# Altium PCB Main_PCB_V1R0_XXXXXX.PcbDoc
Units mm, origin at the board's own origin, x right, y up, seen from the top; angles counter-clockwise.
Board outline 134.2 x 88.35 mm, 2 copper layers (Top Layer, Bottom Layer), stack 1.49 mm thick; 85 components, 40 nets, 202 pads, 24 vias.
Unrouted connection lines stored in the file: 149.
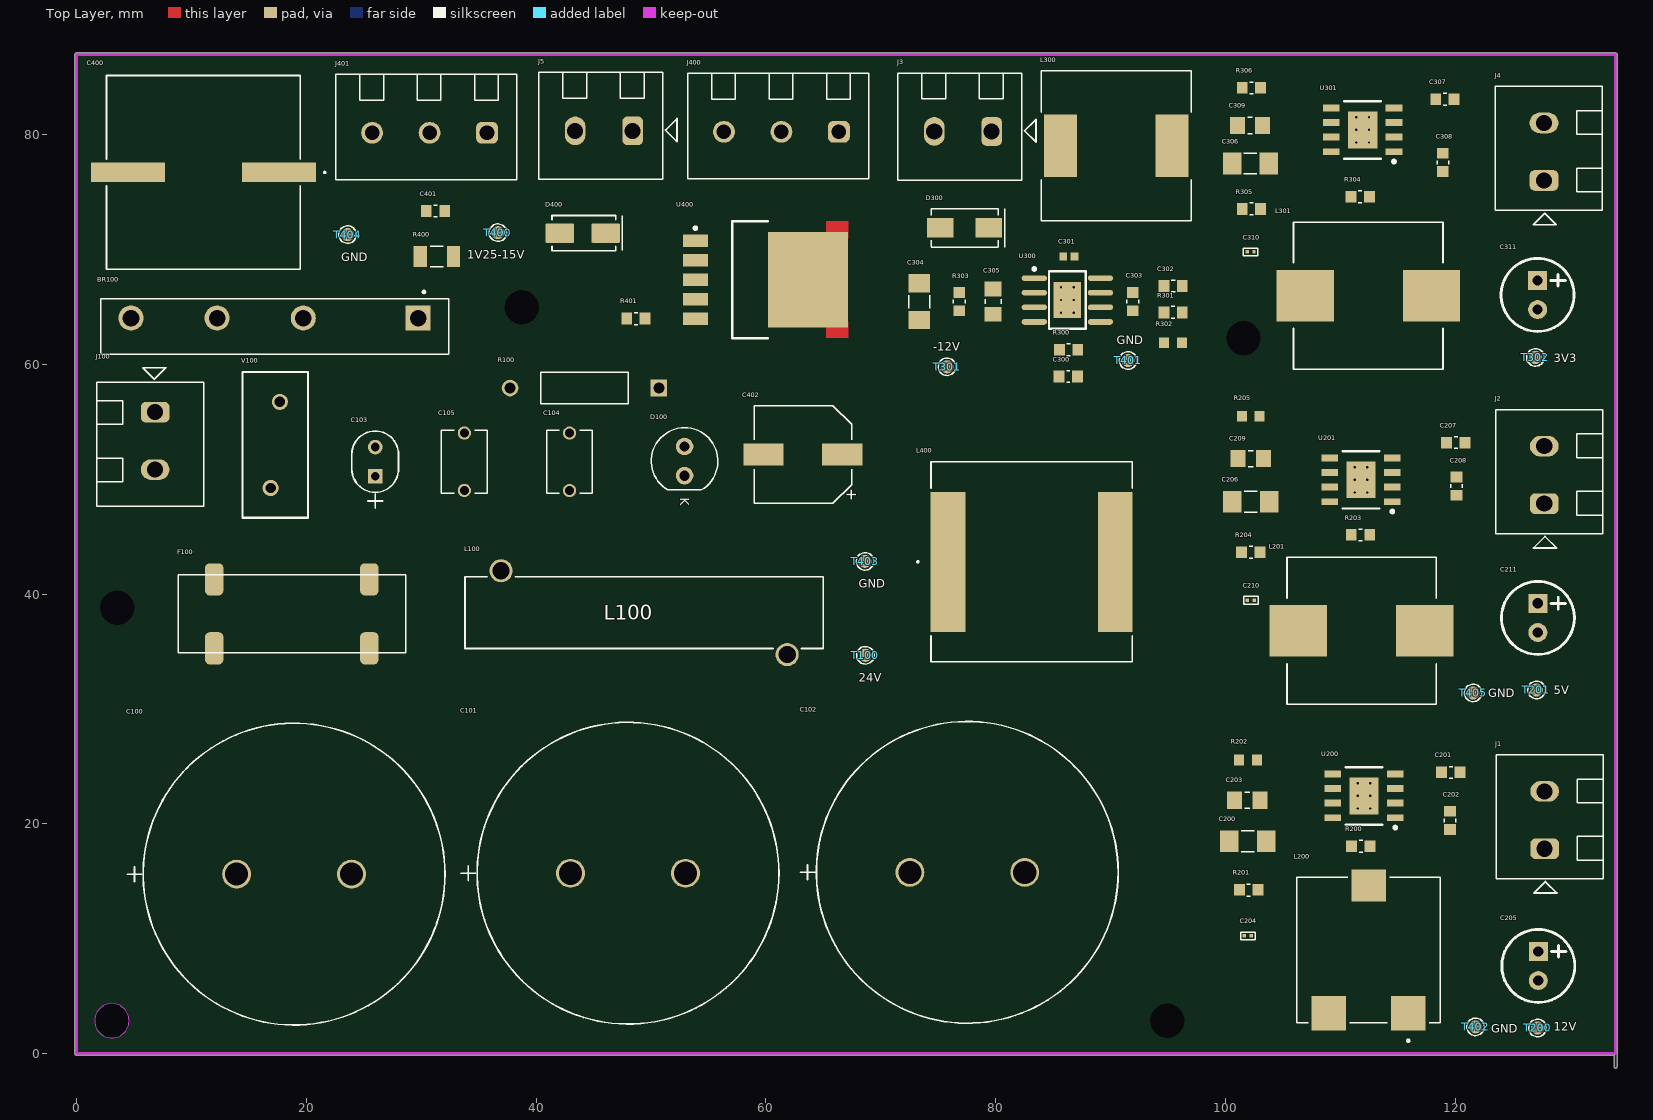
[diagram p0: Top Layer view]
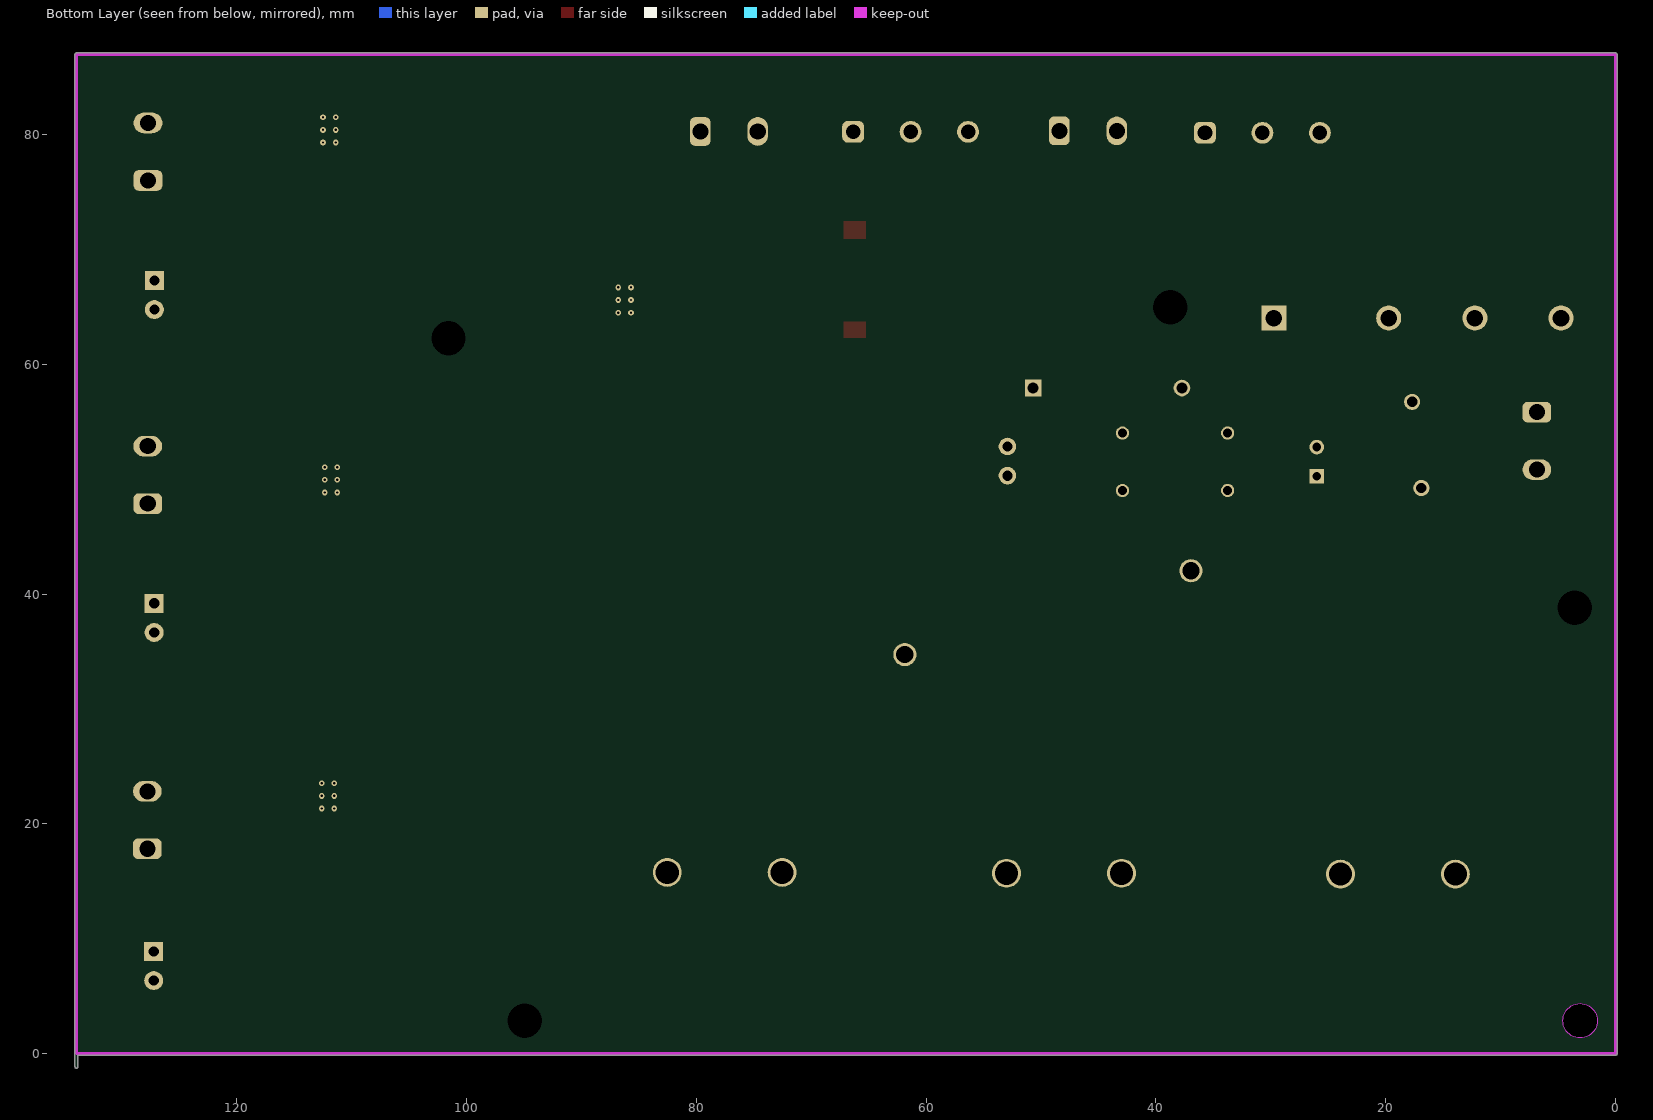
[diagram p1: Bottom Layer view, seen from below]

## Layer stack, top to bottom
Top Solder: solder mask 0.0102, Solder Resist, Dk 3.5
Top Layer: signal copper 0.03
Dielectric 1: dielectric 1.43, FR-4, Dk 4.8
Bottom Layer: signal copper 0.03
Bottom Solder: solder mask 0.0102, Solder Resist, Dk 3.5

## Board outline
-0.127,0 ccw(c0,0) 0,-0.127 133.821,-0.127 133.821,-1.13 ccw(c133.948,-1.13) 134.075,-1.13 134.075,0 134.075,86.965 ccw(c133.948,86.965) 133.948,87.092 0,87.092 ccw(c0,86.965) -0.127,86.965
cut-out: 1.588,2.87 ccw(c3.088,2.87) 3.088,1.37 ccw(c3.088,2.87) 4.588,2.87 ccw(c3.088,2.87) 3.088,4.37 ccw(c3.088,2.87)

## Design rules (kind name [scope] priority, off if disabled: settings)
Clearance [All] p1: gap=0.254 ignorepadtopadclearanceinfootprint=FALSE
PolygonConnect [All] p1: connectstyle=Relief reliefconductorwidth=0.254 reliefentries=4 polygonreliefangle="90 Angle" airgapwidth=0.254
RoutingVias [All] p1: holewidth=0.711 width=1.27 viastyle="Through Hole" minholewidth=0.711 minwidth=1.27 maxholewidth=0.711 maxwidth=1.27
SolderMaskExpansion [All] p1: expansion=0.102 istentingtop=FALSE
SupplyNets "Schematic Supply Nets_3" [InNet('GND')] p1: voltage=0.000
Width [All] p1: maxlimit=0.254 minlimit=0.254 preferedwidth=0.254
30 further rules are at their usual default settings.

## Components (designator, comment, footprint, x,y, rotation, side; value= is the part's Value field where it differs from the comment)
BR100 "25A_50V" BR_25A_50V_GBJ_Bridge 17.245,63.294 r180 top
C100 "6800uF_50V" Cap_6800uF_TH_25*40_50V 13.945,15.628 r0 top value=6800uF
C101 "6800uF_50V" Cap_6800uF_TH_25*40_50V 43.002,15.707 r0 top value=6800uF
C102 "6800uF_50V" Cap_6800uF_TH_25*40_50V 72.528,15.785 r0 top value=6800uF
C103 "100nF_50V" Cap_100nF_X7R-RADIAL_50V 26.001,48.094 r90 top value=100nF
C104 "10uF_50V" Cap_10uF_X7R_RADIAL_50V 42.911,51.512 r90 top value=10uF
C105 "10uF_50V" Cap_10uF_X7R_RADIAL_50V 33.761,51.518 r90 top value=10uF
C200 "10uF 50V" 1206 101.943,18.482 r0 top value=10uF
C201 "0.1uF 50V" 0603 119.612,24.485 r180 top value=0.1uF
C202 "0.1uF 50V" 0603 119.535,20.306 r90 top value=0.1uF
C203 "1uF 25V" 0805 101.896,22.067 r0 top value=1uF
C204 "100pF 25V" 0201 101.941,10.259 r180 top value=100pF
C205 "47uF 25V" RADIAL-CAN_LSx2.54mm_Diax6.35mm 127.222,7.636 r270 top value=47uF
C206 "10uF 50V" 1206 102.201,48.036 r0 top value=10uF
C207 "0.1uF 50V" 0603 120.044,53.18 r0 top value=0.1uF
C208 "0.1uF 50V" 0603 120.101,49.395 r90 top value=0.1uF
C209 "1uF 25V" 0805 102.201,51.794 r0 top value=1uF
C210 "100pF 25V" 0201 102.203,39.463 r0 top value=100pF
C211 "47uF 25V" RADIAL-CAN_LSx2.54mm_Diax6.35mm 127.185,37.927 r270 top value=47uF
C300 "1uF_50V" Cap_1uF_0603_X5R_50V 86.318,58.93 r0 top value=1uF
C301 "100nF 25V" 0402_RF 86.377,69.372 r180 top value=0.1uF
C302 "0.068uF 50V" 0603_1.4mm 95.441,66.815 r180 top value=68nF
C303 "680pF 50V" 0603 91.928,65.456 r90 top value=680pF
C304 "10uF 50V" 1206 73.351,65.451 r270 top value=10uF
C305 "15uF_25V" Cap_15uF_X5R-0805_25V 79.774,65.451 r90 top value=15uF
C306 "10uF 50V" 1206 102.181,77.468 r180 top value=10uF
C307 "0.1uF 50V" 0603 119.097,83.062 r180 top value=0.1uF
C308 "0.1uF 50V" 0603 118.921,77.572 r90 top value=0.1uF
C309 "1uF 25V" 0805 102.134,80.782 r180 top value=1uF
C310 "100pF 25V" 0201 102.183,69.78 r0 top value=100pF
C311 "47uF 25V" RADIAL-CAN_LSx2.54mm_Diax6.35mm 127.164,66.032 r270 top value=47uF
C400 "470uF_50V" SMD_16*16*16 11.045,76.694 r180 top value=470uF
C401 "680pF 50V" 0603 31.248,73.342 r0 top value=680pF
C402 "100uF 20%" RADIAL-CAN-SMD_Diax8mm_Hx10.2mm 63.227,52.146 r180 top value=220uF
D100 "GREEN" LED_TH_5MM_GREEN 52.928,51.575 r270 top
D300 "60V 3A" DO_214AC 77.291,71.866 r180 top
D400 "40V_5A" D_40V_5A_DO-214AC_Schottky 44.165,71.413 r180 top
F100 "16A_500V" F_16A_500V_Cartridge_5x20mm_OGN 18.739,38.28 r0 top
J1 "Con_2*1_TH_5mm_14.3*10.5_300V_15A" Con_2*1_TH_5mm_14.3*10.5_300V_15A 127.779,20.335 r90 top
J2 "Con_2*1_TH_5mm_14.3*10.5_300V_15A" Con_2*1_TH_5mm_14.3*10.5_300V_15A 127.743,50.369 r90 top
J3 "Con_2*1_TH_5mm_14.3*10.5_300V_15A" Con_2*1_TH_5mm_14.3*10.5_300V_15A 77.155,80.261 r180 top
J4 "Con_2*1_TH_5mm_14.3*10.5_300V_15A" Con_2*1_TH_5mm_14.3*10.5_300V_15A 127.722,78.499 r90 top
J5 "Con_2*1_TH_5mm_14.3*10.5_300V_15A" Con_2*1_TH_5mm_14.3*10.5_300V_15A 45.908,80.313 r180 top
J100 "Con_2*1_TH_5mm_14.3*10.5_300V_15A" Con_2*1_TH_5mm_14.3*10.5_300V_15A 6.848,53.332 r270 top
J400 "Conn 3POS" CON_3x1_TH_5mm 61.351,80.23 r180 top
J401 "Conn 3POS" CON_3x1_TH_5mm 30.734,80.143 r180 top
L100 "10uH_10A" 3L_10uH_10A_THT_25*3 36.955,42.032 r0 top value=10uH
L200 "CSCM1256-6R0M" L_6uH_9.4A_CSCM1256 112.457,9.026 r0 top value=6uH
L201 "4.8uH_11A" L_4.8uH_11A_1312 111.848,36.802 r180 top value=4.8uH
L300 "47uH_2.6A" L-SMD_47uH_2.6A_12.5*12.5 90.503,79.016 r0 top value=47uH
L301 "4.8uH_11A" L_4.8uH_11A_1312 112.429,65.969 r180 top value=4.8uH
L400 "47uH_5A" L_47uH_5A_SMD_17.15x17 83.129,42.81 r0 top value=47uH
R100 "1k1_0.5W" Res_1k1_TH_0.5W 50.691,57.935 r180 top value=1.1k
R200 "100k 1/10W" 0603 111.777,18.065 r0 top value=100k
R201 "10k 1/10W" 0603 102.019,14.256 r0 top value=10k
R202 "523_0.1W" Res_523_0603_0.1W 101.964,25.566 r0 top value=523
R203 "100k 1/10W" 0603 111.748,45.153 r0 top value=100k
R204 "10k 1/10W" 0603 102.201,43.637 r180 top value=10k
R205 "1.37k_0.1W" Res_1.37k_0603_0.1W 102.201,55.467 r180 top value=1.37k
R300 "200k 1/10W" 0603 86.342,61.262 r180 top value=200k
R301 "4k7 1/10W" 0603 95.441,64.512 r180 top value=4k7
R302 "14K_0.125W" Res_14k_0603-SMD_0.125W 95.441,61.87 r0 top value=14k
R303 "1k 1/10W" 0603 76.826,65.451 r270 top value=1k
R304 "100k 1/10W" 0603 111.727,74.593 r0 top value=100k
R305 "10k 1/10W" 0603 102.257,73.51 r180 top value=10k
R306 "2k2 1/10W" 0603 102.257,84.055 r0 top value=2k2
R400 "175_2W" Res_175_SMD-1206_2W 31.372,69.38 r180 top value=175
R401 "10k 1/10W" 0603 48.694,63.985 r0 top value=10k
T100 "24V" TP_SMD_45mil 68.662,34.671 r90 top
T200 "12V" TP_SMD_45mil 127.161,2.239 r90 top
T201 "5V" TP_SMD_45mil 127.065,31.657 r90 top
T301 "-12V" TP_SMD_45mil 75.774,59.782 r90 top
T302 "3V3" TP_SMD_45mil 126.97,60.595 r90 top
T400 "1V25-15V" TP_SMD_45mil 36.682,71.457 r90 top
T401 "GND" TP_SMD_45mil 91.516,60.329 r90 top
T402 "GND" TP_SMD_45mil 121.766,2.336 r90 top
T403 "GND" TP_SMD_45mil 68.629,42.845 r90 top
T404 "GND" TP_SMD_45mil 23.603,71.289 r90 top
T405 "GND" TP_SMD_45mil 121.549,31.399 r90 top
U200 "SY8205FCC" SOIC127P600X160_HS-9N 112.058,22.427 r180 top
U201 "SY8205FCC" SOIC127P600X160_HS-9N 111.798,49.931 r180 top
U300 "TPS54360DDAR" SOIC127P600X170_HS-9N 86.24,65.591 r0 top
U301 "SY8205FCC" SOIC127P600X160_HS-9N 111.936,80.388 r180 top
U400 "LM2596SX-ADJ/NOPB" DPAK170P1435X457-6N 60.064,67.357 r0 top
V100 "29V_500A" Var_29V_500A_TH_DISC_10MM 17.311,52.981 r270 top

## Footprints (in the part's own frame and the unit in brackets; to place one, negate y for a bottom-side part, rotate by r counter-clockwise, add the part's x,y. Pads: shape width x height; smd on the part's side, far side on the other; paste and mask are expansions set on the pad)
3L_10uH_10A_THT_25*3 [mil] "/20261022/"
  round 79 hole 59 paste-99999 mask+0: 1(0,0) 2(980.31,-287.4)
  silkscreen extent -123,-267 1104,-21, body extent -114,-313 1103,26, height 338
0201 [mm] "20211214 / E.Naranjo"
  rect 0.3x0.3 smd: 1(-0.3,0) 2(0.3,0)
  silkscreen extent -0.63,-0.33 0.63,0.33, body extent -0.32,-0.15 0.32,0.15, height 0.33
0402_RF [mil] "1005 Metric / 20190221 / C-A.Serna.A"
  rect 27x27 smd: 1(-19.5,0) 2(19.5,0)
  body extent -20,-10 19,10, height 22
0603 [mil] "1608 Metric / 20190221 / C-A.Serna.A"
  rect 37x40 smd: 1(-31.5,0) 2(31.5,0)
  silkscreen extent -6,-20 6,20, body extent -31,-16 31,16, height 12
0603_1.4mm [mil] "1608 Metric/20230206/J-A.Sepulveda"
  rect 37x40 smd: 1(-31.5,0) 2(31.5,0)
  silkscreen extent -6,-20 6,20, body extent -31,-16 31,16, height 59
0805 [mm] "2012 Metric / 20190221 / C-A.Serna.A"
  rect 1.3x1.5 smd: 1(-1.1,0) 2(1.1,0)
  silkscreen extent -0.2,-0.7 0.2,0.7, body extent -1.13,-0.7 1.07,0.7, height 1
1206 [mm] "3216 Metric / 20190221 / C-A.Serna.A"
  rect 1.6x1.9 smd: 1(-1.6,0) 2(1.6,0)
  silkscreen extent -0.55,-0.9 0.57,0.9, body extent -1.6,-0.8 1.6,0.8, height 2
BR_25A_50V_GBJ_Bridge [mm] "/20261102/"
  rect 2.18x2.18 hole 1.45: 1(-12.5,-0.725)
  round 2.18 hole 1.45: 2(-2.5,-0.725) 3(5,-0.725) 4(12.5,-0.725)
  silkscreen extent -15.15,-3.1 15.15,2.4, body extent -15,-2.2 15,2.4, height 24.6
Cap_1uF_0603_X5R_50V [mil] "/20261021/"
  rect 37x40 smd: 1(-31.5,0.01) 2(31.5,0.01)
  silkscreen extent -6,-20 6,20, body extent -31,-16 32,16, height 12
Cap_10uF_X7R_RADIAL_50V [mm] "/20261022/"
  round 1.15 hole 0.8: 1(-2.5,0) 2(2.5,0)
  silkscreen extent -2.75,-2 2.75,2, body extent -2.75,-2 2.75,2, height 7
Cap_15uF_X5R-0805_25V [mm] "/20261021/"
  rect 1.3x1.5 smd: 1(-1.1,0) 2(1.1,0)
  silkscreen extent -0.2,-0.7 0.2,0.7, body extent -1.13,-0.7 1.07,0.7, height 1
Cap_100nF_X7R-RADIAL_50V [mil] "/20261102/"
  rect 50x50 / inner round 60 / far side rect 50x50 hole 30 paste-99999 mask-25: 1(85,0)
  round 50 / inner round 60 / far side round 50 hole 30 paste-99999 mask-25: 2(185,0)
  silkscreen extent -25,-80 240,80, body extent 35,-75 235,75, height 260
Cap_6800uF_TH_25*40_50V [mil] "/20261022/"
  round 99 hole 79 paste-99999 mask+0: 1(0,0) 2(393.7,0)
  silkscreen extent -375,-517 714,517, body extent -315,-512 710,512, height 1655
Con_2*1_TH_5mm_14.3*10.5_300V_15A [mm] "/20201021/"
  rrect50% 1.8x2.5 hole 1.397: 1(-2.5,0)
  oval 1.8x2.5 hole 1.397: 2(2.5,0)
  silkscreen extent -6.36,-5.08 5.68,4.23, body extent -5,-5.1 5.4,3.9, height 11.41
CON_3x1_TH_5mm [mm] "/ 20190222 / C-A.Serna.A"
  rrect50% 1.9x1.9 hole 1.27: 1(-5,0)
  round 1.9 hole 1.27: 2(0,0) 3(5,0)
  silkscreen extent -7.6,-5.08 8.15,4.1, body extent -7.51,-4.99 8.06,4.01, height 11.7
D_40V_5A_DO-214AC_Schottky [mm] "/20261020/"
  rrect15% 2.5x1.7 smd paste+0 mask+0: 1(-1.902,0) 2(2.098,0)
  silkscreen extent -3.33,-1.52 2.77,1.52, body extent -2.64,-1.4 2.64,1.4, height 2.34
DO_214AC [mm] "SMA / 20190225 / C-A.Serna.A"
  rect 2.3x1.7 smd: 1(-2.1,0) 2(2.1,0)
  silkscreen extent -3.5,-1.66 2.92,1.66, body extent -2.74,-1.4 2.74,1.4, height 2.3
DPAK170P1435X457-6N [mm] "D2-PAK, 6-Pads, Body 7,55x8,44mm (max), IPC Medium Density"
  rect 2.16x1.07 smd: 1(-6.2,3.4) 2(-6.2,1.7) 3(-6.2,0) 4(-6.2,-1.7) 5(-6.2,-3.4)
  rect 6.99x8.33 smd paste-0.102 mask+0.051: 6(3.61,0.01)
  Top Layer region: 7.105,-5.06 7.105,-3.66 5.195,-3.66 5.195,-5.06
  Top Layer region: 7.105,3.575 7.105,5.075 5.195,5.075 5.195,3.575
  silkscreen extent -6.32,-5.1 0.11,5.1, body extent -7.33,-5.06 6.97,5.1, height 4.58
F_16A_500V_Cartridge_5x20mm_OGN [mm] "/20261021"
  rrect50% 1.6x2.8 smd: 1(-6.75,-3) 1(-6.75,3) 2(6.75,-3) 2(6.75,3)
  silkscreen extent -9.9,-3.4 9.9,3.4, body extent -9.91,-4.32 9.91,4.32, height 8.06
L-SMD_47uH_2.6A_12.5*12.5 [mil] "/20261021/"
  rect 114x213 smd paste+0 mask+0: 1(-191,0) 2(191,0)
  silkscreen extent -257,-257 257,257, body extent -244,-237 248,255, height 217
L_4.8uH_11A_1312 [mm] "/20262010/"
  rect 5x4.5 smd: 1(-5.5,0) 2(5.5,0)
  silkscreen extent -6.5,-6.4 6.5,6.4, body extent -6.5,-6.4 6.5,6.4, height 5
L_6uH_9.4A_CSCM1256 [mm] "/20261019/J.A.Oviedo"
  rect 3x3 smd paste+0 mask+0.102: 1(3.45,-5.5) 2(-3.45,-5.5)
  rect 3x2.8 smd paste+0 mask+0.102: 3(0,5.6)
  silkscreen extent -6.25,-8 6.25,6.35, body extent -6.25,-6.35 6.25,6.35, height 5.81
L_47uH_5A_SMD_17.15x17 [mil] "/20261021/"
  rect 118.59x480 smd paste+0 mask+0: 1(-286.61,0) 2(286.61,0)
  silkscreen extent -393,-342 345,343, body extent -340,-337 340,337, height 160
LED_TH_5MM_GREEN [mil] "/20261022/"
  round 60 hole 35: 1(-50,0) 2(50,0)
  silkscreen extent -114,-114 99,114, body extent -116,-116 98,116, height 1012
RADIAL-CAN-SMD_Diax8mm_Hx10.2mm [mm] "/  270326 / J.Jaramillo"
  rect 3.5x1.95 smd: 1(-3.425,0) 2(3.425,0)
  silkscreen extent -4.25,-4.25 4.25,4.25, body extent -4.65,-4.25 4.65,4.25, height 10.8
RADIAL-CAN_LSx2.54mm_Diax6.35mm [mil] "/20210512/C-A.Serna.A"
  rect 65x65 / inner round 0 / far side rect 65x65 hole 35: 1(-50,0)
  round 65 / inner round 0 / far side round 65 hole 35: 2(50,0)
  silkscreen extent -125,-125 125,125, body extent -125,-125 125,125, height 444
Res_1.37k_0603_0.1W [mm] "/20261020/"
  rect 0.87x0.93 smd paste+0 mask+0.102: 1(-0.78,0) 2(0.78,0)
  body extent -0.8,-0.4 0.8,0.4, height 0.55
Res_1k1_TH_0.5W [mil] "/20261023/"
  rect 57x57 hole 37 paste-99999 mask+0: 1(0,0)
  round 57 hole 37 paste-99999 mask+0: 2(510,0)
  silkscreen extent 105,-54 405,54, body extent -14,-49 524,49, height 98
Res_14k_0603-SMD_0.125W [mm] "/20261021/"
  rect 0.87x0.93 smd paste+0 mask+0.102: 1(-0.78,0) 2(0.78,0)
  body extent -0.8,-0.4 0.8,0.4, height 0.55
Res_175_SMD-1206_2W [mm] "/20261021/"
  rect 1.15x1.8 smd: 1(-1.45,0) 2(1.45,0)
  silkscreen extent -0.55,-0.9 0.57,0.9, body extent -1.55,-0.76 1.5,0.76, height 0.9
Res_523_0603_0.1W [mm] "/20261019/J.A.Oviedo"
  rect 0.87x0.93 smd paste+0 mask+0.102: 1(-0.78,0) 2(0.78,0)
  body extent -0.8,-0.4 0.8,0.4, height 0.55
SMD_16*16*16 [mm] "/20261021/"
  rect 6.445x1.695 smd paste+0 mask+0: 1(-6.574,0) 2(6.574,0)
  silkscreen extent -10.63,-8.43 8.43,8.43, body extent -9.3,-8.31 9.3,8.31, height 17.55
SOIC127P600X160_HS-9N [mm] "SOIC, 8-Leads, Body 4,90x3,90mm, Pitch 1,27mm, Thermal Pad 3,20x2,55mm, IPC Medium Density"
  rect 1.45x0.6 smd: 1(-2.725,1.895) 2(-2.725,0.625) 3(-2.725,-0.645) 4(-2.725,-1.915) 5(2.725,-1.915) 6(2.725,-0.645) 7(2.725,0.625) 8(2.725,1.895)
  rect 2.55x3.2 smd: 9(0,-0.01)
  silkscreen extent -2.85,-2.51 1.6,2.87, body extent -3,-2.51 3,2.49, height 1.6
SOIC127P600X170_HS-9N [mm] "SOIC, 8-Leads, Body 4,90x3,90mm, Pitch 1,27mm, Thermal Pad 3,10x2,40mm, IPC Medium Density"
  oval 2.2x0.5 smd: 1(-2.875,1.905) 2(-2.875,0.635) 3(-2.875,-0.635) 4(-2.875,-1.905) 5(2.875,-1.905) 6(2.875,-0.635) 7(2.875,0.635) 8(2.875,1.905)
  rect 2.4x3.1 smd: 9(0,0)
  silkscreen extent -3,-2.5 1.6,2.83, body extent -2,-2.5 2,2.5, height 1.7
TP_SMD_45mil [mil] "/ 20191219 / M-X.Arias"
  round 45 smd paste-30: 1(0,0)
  silkscreen extent -30,-30 30,30
Var_29V_500A_TH_DISC_10MM [mm] "/20261022/"
  round 1.408 hole 0.9 mask+0.102: 1(-3.749,0.393) 2(3.751,-0.407)
  silkscreen extent -6.35,-2.86 6.35,2.84, body extent -5.49,-1.93 5.5,1.93, height 13.5

## Part data
BR100: library part BR_25A_50V_GBJ_Bridge, "BRIDGE RECT 1PHASE 50V 25A TS-6P", Manufacturer=onsemi, Manufacturer Part Number=DFB2505, Supplier Part Number 1=DFB2505-ND, ComponentLink1Description=Digi-Key, ComponentLink1URL=https://www.digikey.com/product-detail/en/smc-diode-solutions/KMB24STR/1655-1884-1-ND/7898353, Last modified by=J.A.Oviedo, Last modified date=20261022, Reel Stock=N/A, Supplier 1=Digi-Key
C100 C101 C102: library part Cap_6800uF_TH_25*40_50V, "CAP ALUM 6800UF 20% 50V SNAP TH", Manufacturer="Cornell Dubilier Knowles", Manufacturer Part Number=SLPX682M050C7P3, ComponentLink1Description=Digi-Key, ComponentLink1URL=https://www.digikey.com/products/en?keywords=493-10137-1-ND, Last modified by=J.A.Oviedo, Last modified date=2026/10/22, Supplier 1=Digi-Key, Supplier Part Number 1=SLPX682M050C7P3
C103: library part Cap_100nF_X7R-RADIAL_50V, "CAP CER 0.1UF 50V X7R RADIAL", Manufacturer=KEMET, Manufacturer Part Number=C320C104K5R5TA, Supplier Part Number 1=399-4264-ND, Last modified by=J.A.Oviedo, Last modified date=20261022, Supplier 1=Digi-Key
C104 C105: library part Cap_10uF_X7R_RADIAL_50V, "10 µF ±10% 50V Capacitores cerámicos X7R Radial", Manufacturer=TDK, Manufacturer Part Number=FG20X7R1H106KRT06, Supplier Part Number 1=445-173297-1-ND, Last modified by=J.A.Oviedo, Last modified date=20261022, Supplier 1=Digi-Key
C200 C206 C304 C306: library part Cap_10uF_1206_50V, "CAP CER 10UF 50V X5R 1206", Manufacturer="Murata Electronics North America", Manufacturer Part Number=GRT31CR61H106ME01L, Supplier Part Number 1=490-12457-1-ND, ComponentLink1Description=Digi-Key, ComponentLink1URL=https://www.digikey.com/product-detail/en/murata-electronics-north-america/GRT31CR61H106ME01L/490-12457-1-ND/5417158, Last modified by=J.Jaramillo, Last modified date=20240309, Supplier 1=Digi-Key
C201 C202 C207 C208 C307 C308: library part Cap_0.1uF_0603_50V, "CAP CER 0.1UF 50V X7R 0603", Manufacturer="Samsung Electro-Mechanics", Manufacturer Part Number=CL10B104JB8NNNC, Supplier Part Number 1=1276-1033-1-ND, ComponentLink1Description=Digi-key, ComponentLink1URL=https://www.digikey.com/en/products/detail/samsung-electro-mechanics/CL10B104JB8NNNC/3886691?s=N4IgTCBcDaIIxgOwDYC0cAMBmL7UDkAREAXQF8g, Last modified by=J.Jaramillo, Last modified date=20240309, Supplier 1=Digi-Key
C203 C209 C309: library part Cap_1uF_0805_25V, "CAP CER 1UF 25V X7R 0805", Manufacturer=Yageo, Manufacturer Part Number=CC0805KKX7R8BB105, Supplier Part Number 1=311-1456-1-ND, ComponentLink1Description=Digi-Key, ComponentLink1URL=https://www.digikey.com/product-detail/en/yageo/CC0805KKX7R8BB105/311-1456-1-ND/2833762, Last modified by=J.Jaramillo, Last modified date=20240309, Supplier 1=Digi-Key
C204 C210 C310: library part Cap_100pF_0201_25V, "CAP CER 100PF 25V NP0 0201", Manufacturer="Murata Electronics", Manufacturer Part Number=GRM0335C1E101GA01D, Supplier Part Number 1=490-17802-1-ND, ComponentLink1Description=Digi-Key, ComponentLink1URL=https://www.digikey.com/en/products/detail/murata-electronics/GRM0335C1E101GA01D/4358566?s=N4IgTCBcDaIOICUCyAGAzGgrAYQIwFFcVc4BBYgERAF0BfIA, Last modified by=J.Jaramillo, Last modified date=20240309, Supplier 1=Digi-Key
C205 C211 C311: library part Cap_47uF_25V_ALU_THT, "CAP 47uf/25V,10*16,105℃ RADIAL", Manufacturer=SamXon, Manufacturer Part Number="KM 47U/25V", ComponentLink1Description=Datasheet, ComponentLink1URL=CMP000351_KM-Series, Last modified by=J.Jaramillo, Last modified date=20240309, Supplier 1=Poshton, Supplier Part Number 1="KM 47U/25V"
C300: library part Cap_1uF_0603_X5R_50V, "C0603X5R500-105KNP-CT", Manufacturer=Venkel, Supplier Part Number 1=2679-C0603X5R500-105KNP-CT-ND, Last modified by=J.A.Oviedo, Last modified date=20261021, Manufacturer Part Number=C0603X5R500-105KNP-CT, Supplier 1=Digi-Key
C301: library part Cap_0.1uF_0402_25V, "CAP CER 0.1UF 25V X7R 0402", Manufacturer=Yageo, Manufacturer Part Number=CC0402KRX7R8BB104, Supplier Part Number 1=311-2077-1-ND, ComponentLink1Description=Digi-key, ComponentLink1URL=https://www.digikey.com/products/en?keywords=311-2077-1-ND, Last modified by=J.Jaramillo, Last modified date=20240309, Supplier 1=Digi-Key
C302: library part Cap_0.068uF_0603_50V, "CAP CER 0.068UF 50V X7R 0603", Manufacturer="Samsung Electro-Mechanics", Manufacturer Part Number=CL10B683KB8NNNC, Supplier Part Number 1=1276-1814-1-ND, ComponentLink1Description=Digi-key, ComponentLink1URL=https://www.digikey.com/product-detail/en/samsung-electro-mechanics/CL10B683KB8NNNC/1276-1814-1-ND/3889900, Last modified by=J.Jaramillo, Last modified date=20240309, Reel Stock=N/A, Supplier 1=Digi-Key
C303 C401: library part Cap_680pF_0603_50V, "CAP CER 680PF 50V X7R 0603", Manufacturer=KEMET, Manufacturer Part Number=C0603C681K5RAC7867, Supplier Part Number 1=399-C0603C681K5RAC7867CT-ND, ComponentLink1Description=Digi-Key, ComponentLink1URL=https://www.digikey.com/en/products/detail/kemet/C0603C681K5RAC7867/411079, Last modified by=J.Jaramillo, Last modified date=20240309, Supplier 1=Digi-Key
C305: library part Cap_15uF_X5R-0805_25V, "CAP CER 15UF 25V X5R 0805", Manufacturer=TDK, Manufacturer Part Number=C2012X5R1E156M125AC, Supplier Part Number 1=445-9078-1-ND, Last modified by=J.A.Oviedo, Last modified date=20261021, Supplier 1=Digi-Key
C400: library part Cap_470uF_ALU_SMD-16*16*16, "CAP ALUM 470UF 20% 50V SMD", Manufacturer="Vishay Beyschlag/Draloric/BC Components", Manufacturer Part Number=MAL214699108E3, Supplier Part Number 1=4442PHCT-ND, ComponentLink1Description=Digi-Key, ComponentLink1URL=https://www.digikey.com/en/products/detail/rubycon/50TZV100M8X10-5/3134931, Last modified by=J.A.Oviedo, Last modified date=20261021, Supplier 1=Digi-Key
C402: library part Cap_220uF_35V_ALU_SMD, "CAP ALUM 220uF ±20% 35V SMD", Manufacturer=ROQANG, Manufacturer Part Number=RVT1V221M0810, Supplier Part Number 1=C72498, ComponentLink1Description=LCSC, ComponentLink1URL=https://www.lcsc.com/product-detail/C72498.html?s_z=n_C72498, ComponentLink2Description=Datasheet, ComponentLink2URL=https://www.lcsc.com/product-detail/C72498.html?s_z=n_C72498, Last modified by=J.Jaramillo, Last modified date=270326, Reel Stock=N/A, Supplier 1=LCSC
D100: library part LED_TH_5MM_GREEN, "LED GREEN DIFFUSED 5MM ROUND T/H", Manufacturer="Würth Elektronik", Manufacturer Part Number=151051VS04000, Supplier Part Number 1=732-5017-ND, ComponentLink1Description=Digi-key, ComponentLink1URL=https://www.digikey.tw/products/en?keywords=511-1635-1-ND, Last modified by=J.A.Oviedo, Last modified date=20261022, Reel Stock=N/A, Supplier 1=Digi-key
D300: library part D_Schottky_60V_3A_DO_214AC, "DIODE SCHOTTKY 60V 3A DO214AC", Manufacturer="Taiwan Semiconductor Corporation", Manufacturer Part Number="TSSA3U60 R3G", Supplier Part Number 1=TSSA3U60R3GCT-ND, ComponentLink1Description=Digi-Key, ComponentLink1URL=https://www.digikey.com/products/en?keywords=TSSA3U60R3GCT-ND, Last modified by=J.Jaramillo, Last modified date=20240310, Reel Stock=N/A, Supplier 1=Digi-Key
D400: library part D_40V_5A_DO-214AC_Schottky, "DIODE SCHOTTKY 40V 5A DO214AC", Manufacturer="MCC (Micro Commercial Components)", Manufacturer Part Number=SK54A-LTP, Supplier Part Number 1=SK54A-LTPMSCT-ND, ComponentLink1Description=Digi-Key, ComponentLink1URL=https://www.digikey.com/products/en?keywords=1655-1896-1-ND, Last modified by=J.Jaramillo, Last modified date=20240310, Reel Stock=N/A, Supplier 1=Digi-Key
F100: library part F_16A_500V_Cartridge_5x20mm_OGN, "Fusible Bloque 16 A 500V 1 Circuitos Cartucho Orificio pasante", Manufacturer="SCHURTER Inc.", Manufacturer Part Number=3-132-874, Supplier Part Number 1=486-3-132-874-ND, Last modified by=J.A.Oviedo, Last modified date=20261021, Reel Sotck=N/A, Supplier 1=Digi-key
J1 J2 J3 J4 J5 J100: "2 Bloques de terminales - Cable a placa Horizontal con placa 0.197\" (5.00mm) Orificio pasante", Manufacturer="Same Sky (Formerly CUI Devices)", Manufacturer Part Number=TB002-500-02BE, Supplier Part Number 1=102-6145-ND, Last modified by=J.A.Oviedo, Last modified date=20261021, Reel Stock=N/A, Supplier 1=Digi-key
J400 J401: library part Con_3x1_TH_5.0mm, "TERM BLK 3POS SIDE ENTRY 5MM PCB", Manufacturer="Phoenix Contact", Manufacturer Part Number=1935174, Supplier Part Number 1=277-1578-ND, ComponentLink1Description=Digi-Key, ComponentLink1URL=https://www.digikey.com/product-detail/en/phoenix-contact/1935174/277-1578-ND/568615, Last modified by=J.Jaramillo, Last modified date=20240310, Reel Stock=N/A, Supplier 1=Digi-Key
L100: library part L_10uH_10A_THT_25*3, "10 µH No blindado Núcleo de tambor, cableado Inductivo 10 A 8.8mOhm Cilindro radial y horizontal (abierto)", Manufacturer="Würth Elektronik", Manufacturer Part Number=744711010, Supplier Part Number 1=732-3259-ND, Last modified by=J.A.Oviedo, Last modified date=20261022, Reel Stock=N/A, Supplier 1=Digy-key
L200: library part L_6uH_9.4A_CSCM1256, "FIXED IND 6UH 9.4A 6.27 MOHM SMD", Manufacturer=CODACA, Supplier Part Number 1=4044-CSCM1256-6R0MCT-ND, Last modified by=J.A.Oviedo, Last modified date=20261019, Manufacturer Part Number=CSCM1256-6R0M, Reel Stock=N/A, Supplier 1=Digi-key
L201 L301: library part L_4.8uH_11A_1312, "11A 4.8uH ±20% 11.55mΩ 13A Molded inductor SMD,13x12.8mm Fixed Inductors", Manufacturer=Coilank, Manufacturer Part Number=APZBX1250M4R8, Supplier Part Number 1=C54623473, Last modified by=J.A.Oviedo, Last modified date=20261020, Reel Stock=N/A, Supplier 1=LCSC
L300: library part L-SMD_47uH_2.6A_12.5*12.5, "FIXED IND 47UH 2.6A 86 MOHM SMD", Manufacturer="Bourns Inc.", Manufacturer Part Number=SRR1260-470M, Supplier Part Number 1=SRR1260-470MCT-ND, Last modified by=J.A.Oviedo, Last modified date=20261021, Reel Stock=N/A, Supplier 1=Digi-key
L400: library part L_47uH_5A_SMD_17.15x17, "FIXED IND 47UH 5A 108.46 MOHM", Manufacturer="Vishay Dale", Manufacturer Part Number=IHLP6767DZER470M11, Supplier Part Number 1=541-1345-1-ND, Last modified date=20261021, Reel Stock=N/A, Supplier 1=Digi-Key
R100: library part Res_1k1_TH_0.5W, "RES 1.1kΩ ±1% 500mW Through Hole,D2.4xL6.3mm", Manufacturer=YAGEO, Manufacturer Part Number=MFR50SFTE52-1K1, Supplier Part Number 1="YAGEO MFR50SFTE52-1K1", Last modified by=J.A.Oviedo, Last modified date=20261023, Reel Stock=N/A, Supplier 1=LCSC
R200 R203 R304: library part Res_100k_0603_1/10W, "RES 100k OHM 1% 1/10W 0603", Manufacturer="Stackpole Electronics Inc.", Manufacturer Part Number=RMCF0603FT100K, Supplier Part Number 1=RMCF0603FT100KCT-ND, ComponentLink1Description=Digi-Key, ComponentLink1URL=https://www.digikey.com/product-detail/en/stackpole-electronics-inc/RMCF0603FT100K/RMCF0603FT100KCT-ND/1943118, Last modified by=J.Jaramillo, Last modified date=20240310, Reel Stock=N/A, Supplier 1=Digi-Key
R201 R204 R305 R401: library part Res_10k_0603_1/10W, "RES SMD 10K OHM 1% 1/10W 0603", Manufacturer="Samsung Electro-Mechanics", Manufacturer Part Number=RC1608F103CS, Supplier Part Number 1=1276-3485-1-ND, ComponentLink1Description=Digi-key, ComponentLink1URL=https://www.digikey.com/products/en?keywords=1276-3485-1-ND, Last modified by=J.Jaramillo, Last modified date=20240310, Reel Stock=N/A, Supplier 1=Digi-Key
R202: library part Res_523_0603_0.1W, "RES 523 OHM 1% 1/10W 0603", Manufacturer=YAGEO, Manufacturer Part Number=RC0603FR-07523RL, Supplier Part Number 1=311-523HRCT-ND, Last modified by=J.A.Oviedo, Last modified date=20261016, Reel Stock=N/A, Supplier 1=Digi-key
R205: library part Res_1.37k_0603_0.1W, "Fixed Resistor, Metal Glaze/thick Film, 0.1W, 1370ohm, 75V, 1% +/-Tol, 100ppm/Cel, Surface Mount, 0603", Case/Package=0603, Max Operating Temperature=155°C, Min Operating Temperature=-55°C, Power Rating=100mW, Ratings=AEC-Q200, Supplier Part Number=603-AF0603FR-071K37L, Temperature Coefficient=100ppm/°C, Tolerance=1%, Voltage Rating=75V, Category="Chip SMD Resistors", China RoHS=Non-Compliant, ComponentLink1Description="New link", ComponentLink2Description=https://datasheet.octopart.com:443/AF0603FR-071K37L-Yageo-datasheet-182189395.pdf?src-supplier=IHS, ComponentLink2URL=https://datasheet.octopart.com:443/AF0603FR-071K37L-Yageo-datasheet-182189395.pdf?src-supplier=IHS, ComponentLink3Description=https://datasheet.octopart.com:443/AF0603FR-071K37L-Yageo-datasheet-153645569.pdf?src-supplier=Upverter, ComponentLink3URL=https://datasheet.octopart.com:443/AF0603FR-071K37L-Yageo-datasheet-153645569.pdf?src-supplier=Upverter, ComponentLink4Description=https://sigma.octopart.com:443/138820526/technical_drawing/Yageo-AF0603FR-071K37L.pdf?src-supplier=Upverter, ComponentLink4URL=https://sigma.octopart.com:443/138820526/technical_drawing/Yageo-AF0603FR-071K37L.pdf?src-supplier=Upverter, ComponentLink5Description=https://datasheet.octopart.com/AF0603FR-071K37L-Yageo-datasheet-68296209.pdf, ComponentLink5URL=https://datasheet.octopart.com/AF0603FR-071K37L-Yageo-datasheet-68296209.pdf, ComponentLink6Description=http://sigma.octopart.com:80/conflict_mineral_statement/Yageo-company-3.pdf?src-supplier=Compliance+Statements, ComponentLink6URL=http://sigma.octopart.com:80/conflict_mineral_statement/Yageo-company-3.pdf?src-supplier=Compliance+Statements, ComponentLink7Description=http://sigma.octopart.com:80/rohs_statement/Yageo-company-2.pdf?src-supplier=Compliance+Statements, ComponentLink7URL=http://sigma.octopart.com:80/rohs_statement/Yageo-company-2.pdf?src-supplier=Compliance+Statements, Composition="Thick Film", Country of Origin="Mainland China, Taiwan", Export Control Classification Number (ECCN) Code=EAR99, Harmonized Tariff Schedule (HTS) Code=8533.21.00.30, Height=450µm, Introduction Date=2012-05-08, Last modified by=J.A.Oviedo, Last modified date=20261020, Length=1.6mm, Lifecycle Status=Production, Mounting Technology="Surface Mount", Number of Terminals=2, Packaging="Tape & Reel", Pricing="1=0,1, 10=0,022, 50=0,022, 100=0,016, 1000=0,012, 10000=0,008 (USD)", REACH SVHC=Unaffected, Reel Stock=N/A, RoHS=Compliant, Stock=7115, Supplier=Mouser, Supplier 1=Mouser, Supplier Part Number 1=603-AF0603FR-071K37L, Width=800µm, Working Voltage=75V
R300: library part Res_200k_0603_1/10W, "RES 200K OHM 1% 1/10W 0603", Manufacturer="Stackpole Electronics Inc", Manufacturer Part Number=RMCF0603FT200K, Supplier Part Number 1=RMCF0603FT200KCT-ND, ComponentLink1Description=Digi-Key, ComponentLink1URL=https://www.digikey.com/en/products/detail/stackpole-electronics-inc/RMCF0603FT200K/1760715, Last modified by=J.Jaramillo, Last modified date=20240310, Reel Stock=N/A, Supplier 1=Digi-Key
R301: library part Res_4k7_0603_1/10W, "RES SMD 4.7K OHM 1% 1/10W 0603", Manufacturer=Yageo, Manufacturer Part Number=RC0603FR-074K7L, Supplier Part Number 1=311-4.70KHRCT-ND, ComponentLink1Description=Digi-Key, ComponentLink1URL=https://www.digikey.com/product-detail/en/yageo/RC0603FR-074K7L/311-4-70KHRCT-ND/730159, Last modified by=J.Jaramillo, Last modified date=20240310, Reel Stock=N/A, Supplier 1=Digi-Key
R302: library part Res_14k_0603-SMD_0.125W, "RES 14kΩ ±1% 125mW 0805", Manufacturer=FOJAN, Manufacturer Part Number=FRC0805F1402TS, Supplier Part Number 1="FOJAN FRC0805F1402TS", ComponentLink1Description=LCSC, ComponentLink1URL=https://www.lcsc.com/es/product-detail/C2930168.html?s_z=n_q_t_resistor, Last modified by=J.A.Oviedo, Last modified date=20261021, Reel Stock=N/A, Supplier 1=LCSC
R303: library part Res_1k_0603_1/10W, "RES SMD 1K OHM 1% 1/10W 0603", Manufacturer=Yageo, Manufacturer Part Number=RC0603FR-071KL, Supplier Part Number 1=311-1.00KHRCT-ND, ComponentLink1Description=Digi-Key, ComponentLink1URL=https://www.digikey.com/product-detail/en/yageo/RC0603FR-071KL/311-1-00KHRCT-ND/729790, Last modified by=J.Jaramillo, Last modified date=20240310, Reel Stock=N/A, Supplier 1=Digi-Key
R306: library part Res_2k2_0603_1/10W, "RES SMD 2.2K OHM 1% 1/10W 0603", Manufacturer=Yageo, Manufacturer Part Number=RC0603FR-072K2L, Supplier Part Number 1=311-2.20KHRCT-ND, ComponentLink1Description=Digi-Key, ComponentLink1URL=https://www.digikey.com/en/products/detail/yageo/RC0603FR-072K2L/727016?s=N4IgTCBcDaIEoGEAMA2JBmAYnAtEg7GANJgAyIAugL5A, Last modified by=J.Jaramillo, Last modified date=20240310, Reel Stock=N/A, Supplier 1=Digi-Key
R400: library part Res_175_SMD-1206_2W, Manufacturer="Vishay Dale Thin Film", Manufacturer Part Number=PCAN1206E1750BST5, Supplier Part Number 1=764-1138-1-ND, Last modified by=J.A.Oviedo, Last modified date=20261021, Reel Stock=N/A, Supplier 1=Digi-key
T100 T200 T201 T301 T302 T400 T401 T402 T403 T404 T405: library part TP_SMD_45mil, "Test point 45mil pad size", Last modified by=J.Jaramillo, Last modified date=20240310
U200 U201 U301: library part DC/DC_ADJ_5A_SOIC-8-EP, "High Efficiency Fast Response, 5A, 30V Input Synchronous Step Down Regulator", Manufacturer=Silergy, Supplier Part Number 1=C111875, ComponentLink1Description=LCSC, ComponentLink1URL=https://www.lcsc.com/es/product-detail/C111875.html?s_z=n_q_SY8205FCC, ComponentLink2Description=DATASHEET, ComponentLink2URL=https://www.lcsc.com/datasheet/C111875.pdf, Last modified by=J.A.OVIEDO, Last modified date=20261018, Manufacturer Part Number=SY8205FCC, Reel Stock=N/A, Supplier 1=LCSC
U300: library part DC/DC_ADJ_-12V_3.5A_SOIC-8-EP, "60V Input, 3.5A Output Step-Down DC-DC Converter", Manufacturer=TI, Supplier Part Number 1=595-TPS54360DDAR, ComponentLink1Description=LCLS, ComponentLink1URL=https://www.lcsc.com/es/product-detail/C44377.html?s_z=n_q_TPS54360, ComponentLink2Description=DATASHEET, ComponentLink2URL=https://www.lcsc.com/datasheet/C44377.pdf, Last modified by=J.A.Oviedo, Last modified date=2026/10/21, Manufacturer Part Number=TPS54360DDAR, Reel Stock=N/A, Supplier 1=Mouser
U400: library part DCDC_1.25/15V_3A_TO-263-5, "LM2596 SIMPLE SWITCHER 3A Step-Down Voltage Regulator", Manufacturer=TI, Supplier Part Number 1=C29781, ComponentLink1Description=LCSC, ComponentLink1URL=https://www.lcsc.com/es/product-detail/C29781.html?s_z=n_q_t_LM2596, ComponentLink2Description=DATASHEET, ComponentLink2URL=https://www.lcsc.com/datasheet/C29781.pdf, Last modified by=J.A.Oviedo, Last modified date=20261020, Manufacturer Part Number=LM2596SX-ADJ/NOPB, Reel Stock=N/A, Supplier 1=LCSC
V100: library part Var_29V_500A_TH_DISC_10MM, "39 V 500 A Varistor 1 Circuitos Orificio pasante Tipo moneda 10mm", Manufacturer=TDK, Manufacturer Part Number=B72210S0250K101, Supplier Part Number 1=495-3768-ND, Last modified by=J.Jaramillo, Last modified date=20240309, Reel Sotck=N/A, Supplier 1=Digi-key

## Free pads (board coordinates)
  round 1.524 hole 3: 3(3.567,38.812) 4(38.775,64.952) 6(94.922,2.869) 6(101.568,62.249)

## Via types
v1: diameter 0.5, hole 0.2, Top Layer to Bottom Layer, 24 vias

## Nets (pads, with @x,y where several pads share a name; then routed paths per layer and width w, separated by ;. In a path a pad name is that pad's centre, name@x,y a point inside that pad or via, vN(x,y) a via of type N, cw(c..) or ccw(c..) an arc to the next point about the centre after c; other vN are vias at no path point)
5V0: C210.1 C211.1 J2.1 J400.3 L201.2 R204.2 T201.1
GND: BR100.2 C100.2 C101.2 C102.2 C103.2 C104.2 C105.2 C200.2 C201.2 C203.2 C205.2 C206.2 C207.2 C209.2 C211.2 C304.2 C305.1 C306.2 C307.2 C309.2 C311.2 C400.2 C402.2 D100.2 D400.2 J1.2 J2.2 J3.2 J4.2 J5.2 J400.1 L300.2 R202.2 R205.1 R302.2 R306.1 R400.1 R401.1 T401.1 T402.1 T403.1 T404.1 T405.1 U200.9 U201.9 U301.9 U400.3
NetBR100_1: BR100.1 C100.1 C101.1 C102.1 C103.1 L100.1
NetBR100_3: BR100.3 F100.2 V100.2
NetBR100_4: BR100.4 J100.1 V100.1
NetC104_1: C104.1 C105.1 C200.1 C206.1 C300.1 C304.1 C306.1 C400.1 L100.2 R100.2 R200.1 R203.1 R304.1 T100.1 U200.7 U200.8 U201.7 U201.8 U300.2 U301.7 U301.8 U400.1
NetC201_1: C201.1 U200.4
NetC202_1: C202.1 U200.1
NetC202_2: C202.2 L200.1 U200.2
NetC203_1: C203.1 U200.6
NetC204_1: C204.1 C205.1 J1.1 L200.2 R201.2 T200.1
NetC204_2: C204.2 R201.1 R202.1 U200.5
NetC207_1: C207.1 U201.4
NetC208_1: C208.1 U201.1
NetC208_2: C208.2 L201.1 U201.2
NetC209_1: C209.1 U201.6
NetC210_2: C210.2 R204.1 R205.2 U201.5
NetC300_2: C300.2 C302.2 C303.2 R300.1 U300.7
NetC301_1: C301.1 D300.1 L300.1 U300.8
NetC301_2: C301.2 U300.1
NetC302_1: C302.1 R301.1
NetC303_1: C303.1 R301.2 U300.6
NetC305_2: C305.2 D300.2 J3.1 R303.1 T301.1
NetC307_1: C307.1 U301.4
NetC308_1: C308.1 U301.1
NetC308_2: C308.2 L301.1 U301.2
NetC309_1: C309.1 U301.6
NetC310_1: C310.1 C311.1 J4.1 L301.2 R305.2 T302.1
NetC310_2: C310.2 R305.1 R306.2 U301.5
NetC401_1: C401.1 J401.3 R400.2 U400.4
NetC401_2: C401.2 C402.1 J5.1 J400.2 J401.1 J401.2 L400.2 T400.1
NetD100_1: D100.1 R100.1
NetD400_1: D400.1 L400.1 U400.2
NetF100_1: F100.1 J100.2
NetR200_2: R200.2 U200.3
NetR203_2: R203.2 U201.3
NetR300_2: R300.2 U300.4
NetR302_1: R302.1 R303.2 U300.5
NetR304_2: R304.2 U301.3
NetR401_2: R401.2 U400.5
pads on no net: L200.3 U300.3 U300.9 U400.6
copper on no net:
  other v1: 111.508,21.337 112.608,21.337 111.508,22.437 112.608,22.437 111.508,23.537 112.608,23.537 111.248,48.841 112.348,48.841 111.248,49.941 112.348,49.941 111.248,51.041 112.348,51.041 85.69,64.491 86.79,64.491 85.69,65.591 86.79,65.591 85.69,66.691 86.79,66.691 111.386,79.298 112.486,79.298 111.386,80.398 112.486,80.398 111.386,81.498 112.486,81.498

## Keep-outs
Keep-Out Layer:
  lines w0.254: 0,0 0,86.965 133.948,86.965 133.948,0 83.464,0 0,0

## Silkscreen, mask and mechanical layers (free items; w line width, h text height)
Mechanical 2:
  circle w0.013: c3.088,2.87 r1.5
Mechanical 15:
  lines w0.254: 0.461,66.917 0.461,86.177 0.461,86.779 69.537,86.779 69.537,55.108 94.043,55.108 94.043,32.016 72.336,32.016 72.336,45.963 56.788,45.963 56.788,61.168 39.231,61.168 35.991,61.168 36.05,61.227 36.05,66.917 0.461,66.917 ; 70.17,57.908 97.813,57.908 97.813,86.666 70.17,86.666 70.17,57.908 ; 98.527,29.475 133.613,29.475 133.613,57.525 98.527,57.525 98.527,29.475 ; 98.579,58.603 133.665,58.603 133.665,86.653 98.579,86.653 98.579,58.603 ; 98.717,0.389 133.802,0.389 133.802,28.057 98.717,28.057 98.717,0.389

## Dimensions
0,0 to 133.948,0 on Mechanical 2
-0.127,0 to 0,86.965 on Mechanical 2

## Text inside footprints (layer, text, board x,y; h text height)
C402: Top Overlay "+" at 67.877,48.082 h1 r90
D100: Top Overlay "K" at 52.547,48.375 h0.76 r270